# Altium PCB synthetic.PcbDoc
Units mm, origin at the board's own origin, x right, y up, seen from the top; angles counter-clockwise.
Board outline 60 x 40 mm, 2 copper layers (Top, Bottom), stack 0 mm thick; 1 components, 2 nets, 2 pads, 1 vias.
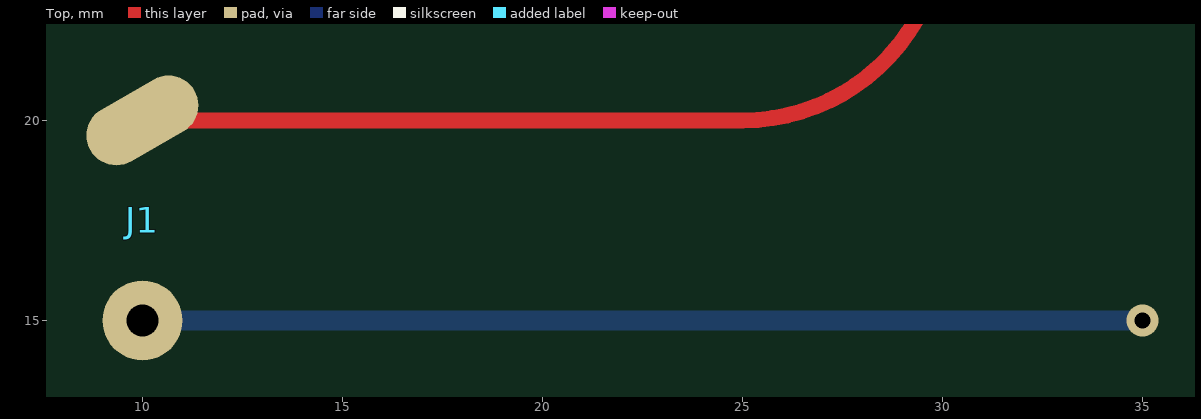
[diagram p0: Top view]
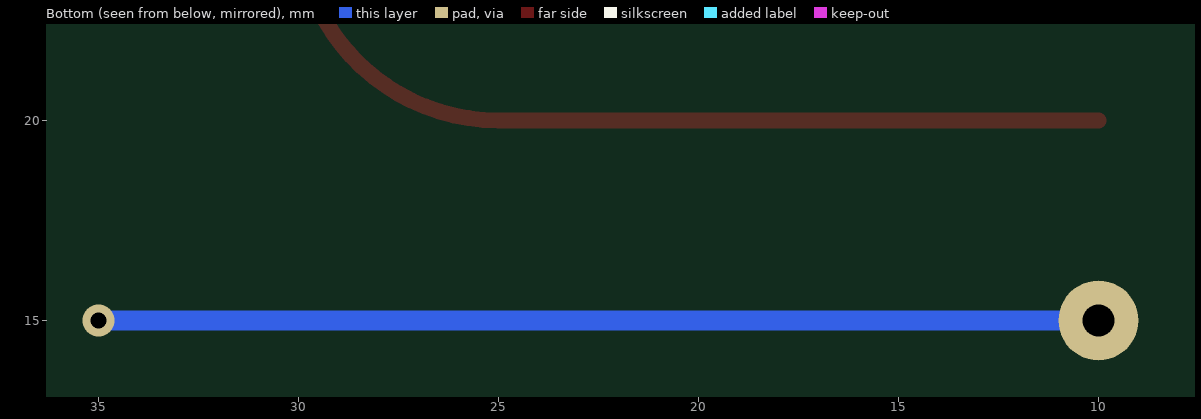
[diagram p1: Bottom view, seen from below]

## Layer stack, top to bottom

## Board outline
0,0 60,0 60,40 0,40

## Components (designator, comment, footprint, x,y, rotation, side; value= is the part's Value field where it differs from the comment)
J1 "" HEADER2 10,15 r0 top

## Footprints (in the part's own frame and the unit in brackets; to place one, negate y for a bottom-side part, rotate by r counter-clockwise, add the part's x,y. Pads: shape width x height; smd on the part's side, far side on the other; paste and mask are expansions set on the pad)
HEADER2 [mm]
  round 2 hole 0.8: 1(0,0)
  oval 3x1.5 smd rot 30: 2(0,5)

## Via types
v1: diameter 0.8, hole 0.4, Top to Bottom, 1 vias

## Nets (pads, with @x,y where several pads share a name; then routed paths per layer and width w, separated by ;. In a path a pad name is that pad's centre, name@x,y a point inside that pad or via, vN(x,y) a via of type N, cw(c..) or ccw(c..) an arc to the next point about the centre after c; other vN are vias at no path point)
GND: J1.1 | length 25
  Bottom w0.5: J1.1 v1(35,15)
VCC: J1.2 | length 22.9
  Top w0.4: J1.2 25,20 ccw(c25,25) 30,25

## Silkscreen, mask and mechanical layers (free items; w line width, h text height)
Top Overlay:
  text "PCBCraft synthetic test" at 6,30 h1.5
Mech1:
  region: 43.431,22.544 50.682,25.925 48.569,30.456 41.318,27.075
  region: 40,5 55,5 55,12 48,9 40,12